# Altium PCB Kasli-DIOT.PCBDOC (part 5 of 23)
Units mm, origin at the board's own origin, x right, y up, seen from the top; angles counter-clockwise.
Board outline 222.9 x 100 mm, 10 copper layers (TopLayer, Layer 2, Layer 3, Layer 4, Layer 5, Layer 6, Layer 7, layer 8, Layer 9, BottomLayer), stack 1.564 mm thick; 977 components, 900 nets, 4676 pads, 2725 vias.
Unrouted connection lines stored in the file: 17.
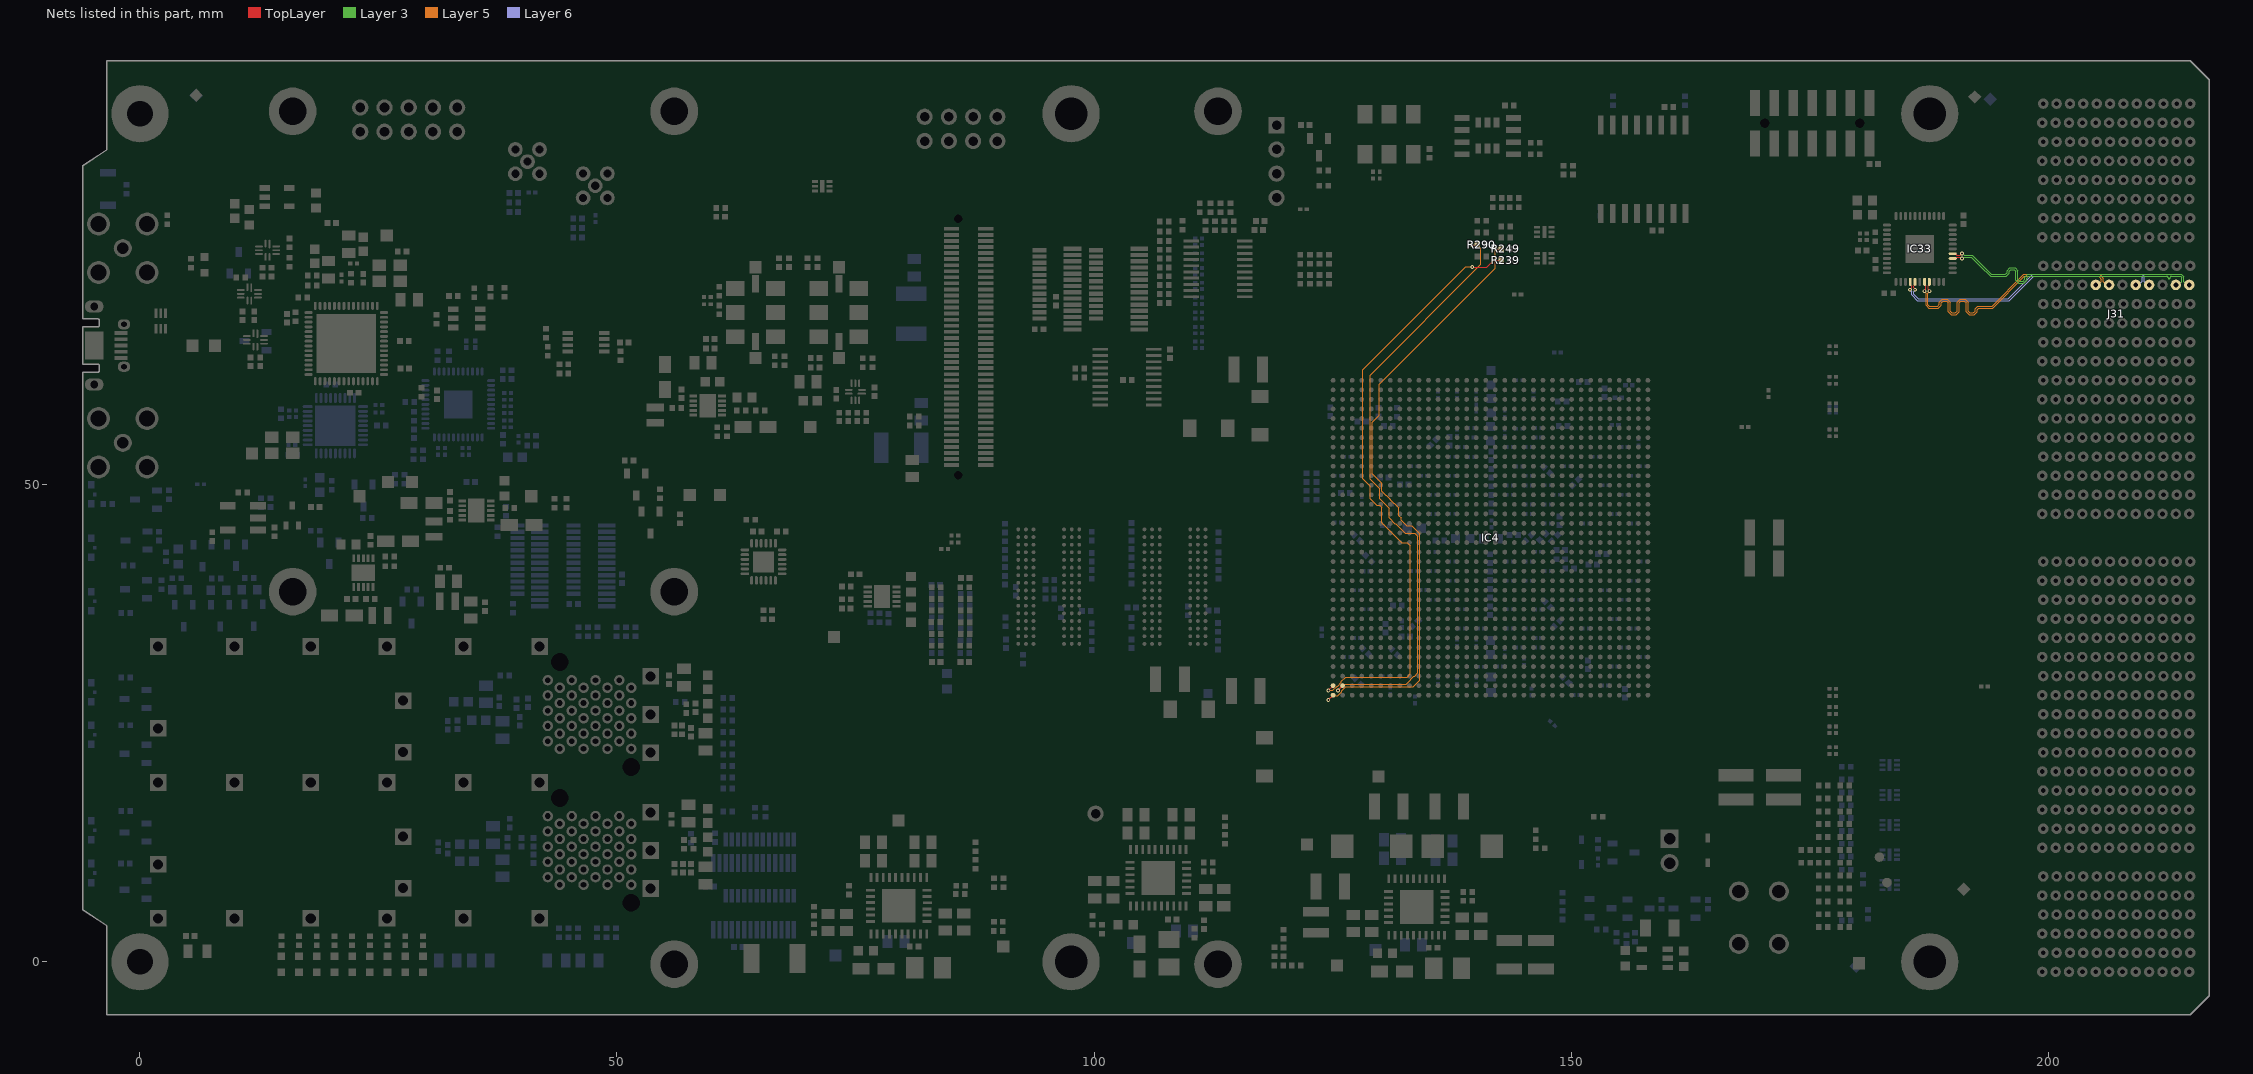
[diagram p12: the nets of this part, all layers, seen from the top]

## Part data (continued)
IC22: "Dual Bidirectional I2C Bus And SMBus Voltage-Level Translator", Case=SSOP8, Manufacturer="TEXAS INSTRUMENTS", Author="CERN DEM JLC", Bonding=No, ComponentHeight=1.3mm, Component Type=Standard, CreateDate=25.02.2013, Device=PCA9306DCTR, HelpURL=\\cern.ch\dfs\Applications\Altium\Datasheets\PCA9306DCTR.pdf, LatestRevisionDate=11.02.2016, Manufacturer Part Number=PCA9306DCTR, Mounted=Yes, PackageDescription="SOP, 0.65mm, Pitch; 8 Pin, 2.80mm W X 2.95mm L X 1.30mm H Body, PC Medium Density", Part Description="Dual Bidirectional I2C Bus And SMBus Voltage-Level Translator", Part Number=PCA9306DCTR, Pin Count=8, PressFit=No, Sense=No, SMD=Yes, Socket=No
IC24 IC25 IC34: "16-bit I/O Port Expander With Serial Interface", Case=SSOP28, Manufacturer="MICROCHIP TECHNOLOGY", Author="CERN DEM JLC", Bonding=No, ComponentHeight=2mm, Component Type=Standard, CreateDate=2011-01-17, Device=MCP23017-E/SS, HelpURL=\\cern.ch\dfs\Applications\Altium\Datasheets\MCP23017-E-SS.pdf, LatestRevisionDate=2011-01-17, Manufacturer Part Number=MCP23017-E/SS, Mounted=Yes, PackageDescription="SOP, 0.65mm Pitch; 28 pin, 5.30mm W X 10.20mm L X 2.00mm H body, IPC Medium Density", Part Description="16-bit I/O Port Expander With Serial Interface", Part Number=MCP23017-E/SS, Pin Count=28, PressFit=No, Sense=No, SMD=Yes, Socket=No
IC26: "500mA Peak Output LDO Regulator", Case=SOT23-5, Manufacturer="MICROCHIP TECHNOLOGY", Author="CERN DEM WB", Bonding=No, ComponentHeight=1.45mm, Component Type=Standard, CreateDate=2019-04-16, Device=MIC5219-3.3YM5, HelpURL=\\cern.ch\dfs\Applications\Altium\Datasheets\MIC5219-3.3YM5.pdf, LatestRevisionDate=2019-04-16, Manufacturer Part Number=MIC5219-3.3YM5, Mounted=Yes, PackageDescription="SOT, 0.95mm pitch; 5 pin, 1.60mm W X 2.90mm L X 1.45mm H body, IPC Medium Density", Part Description="3.3V 500mA Peak Output Low Drop-Out  (LDO) Regulator", Part Number=MIC5219-3.3YM5, Pin Count=5, PressFit=No, Sense=No, SMD=Yes, Socket=No
IC27 IC35: library part CMP-015-00010-1, "Octal Bus Transceiver With 3-State Outputs 20-TSSOP -40 to 125", Case/Package=TSSOP, Max Operating Temperature=125°C, Max Supply Voltage=3.6V, Min Operating Temperature=-40°C, Min Supply Voltage=1.65V, Mounting Technology="Surface Mount", Pins=20
IC28 IC29 IC38: "Low-Voltage 16-Bit I2C-Bus I/O Port with Interrupt and Reset", Case=TSSOP24, Manufacturer="NXP SEMICONDUCTORS", Author="CERN DEM JMW", Bonding=No, Component Type=Standard, ComponentHeight=1.1mm, CreateDate=2020-08-06, Device=PCA9539APW, HelpURL=\\cern.ch\dfs\Applications\Altium\Datasheets\PCA9539APW.pdf, LatestRevisionDate=2020-08-06, Manufacturer Part Number=PCA9539APW, Mounted=Yes, PackageDescription="SOP, 0.65mm Pitch; 24 Pin, 4.40mm W X 7.80mm L X 1.10mm H body, IPC Medium Density", Part Description="Low-Voltage 16-Bit I2C-Bus I/O Port with Interrupt and Reset", Part Number=PCA9539APW, Pin Count=24, PressFit=No, Sense=No, SMD=Yes, Socket=No
IC30: "1.7V-5.5V, 2K I2C Serial EEPROM With EUI-48 Node Identity", Case=SOT23-6, Manufacturer="MICROCHIP TECHNOLOGY", Author="CERN DEM BC", Bonding=No, Component Type=Standard, ComponentHeight=1.45mm, CreateDate=2019-12-06, Device=24AA025E48T-I/OT, HelpURL=\\cern.ch\dfs\Applications\Altium\Datasheets\24AA025E48T-I-OT.pdf, LatestRevisionDate=2019-12-06, Manufacturer Part Number=24AA025E48T-I/OT, Mounted=Yes, PackageDescription="SOT, 0.95mm pitch; 6 pin, 1.60mm W X 2.90mm L X 1.45mm H body, IPC Medium Density", Part Description="1.7V-5.5V, 2K I2C Serial EEPROM With EUI-48™ Node Identity; Cascadable", Part Number=24AA025E48T-I/OT, Pin Count=6, PressFit=No, Sense=No, SMD=Yes, Socket=No
IC31: "1.7V-5.5V, 2K I2C™ Serial EEPROMs with EUI-48™ Node Identity", Case=SOIC8, Manufacturer="MICROCHIP TECHNOLOGY", Author="CERN DEM MR", Bonding=No, Component Type=Standard, ComponentHeight=1.75mm, CreateDate=2016-07-19, Device=24AA025E48-I/SN, HelpURL=\\cern.ch\dfs\Applications\Altium\Datasheets\24AA025E48-I-SN.pdf, LatestRevisionDate=2016-07-19, Manufacturer Part Number=24AA025E48-I/SN, Mounted=Yes, PackageDescription="SOIC, 1.27mm Pitch; 8 Pin - Body 4x5mm, IPC Medium Density", Part Description="1.7V-5.5V, 2K I2C™ Serial EEPROMs with EUI-48™ Node Identity", Part Number=24AA025E48-I/SN, Pin Count=8, PressFit=No, Sense=No, SMD=Yes, Socket=No
IC32: library part CMP-0138-00394-1, "Micropower Voltage Supervisors, 3-Pin SOT-23, Extended Temperature, Tape and Reel", Code_IPC=SOT23-3, DatasheetVersion="revB, Mar-2005", PackageDescription="3-Lead Plastic Small Outline Transistor (TT) [SOT-23]", PackageReference=SOT-23-TT3, PackageVersion="revBB, Aug-2009"
IC37: "3.3V 300mA Voltage Regulator - CMOS Low Dropout", Case=SOT23-5, Manufacturer="ON SEMICONDUCTOR", Author="CERN DEM HF", Bonding=No, Component Type=Standard, ComponentHeight=1mm, CreateDate=20.10.2023, Device=NCP114ASN330T, HelpURL=\\cern.ch\dfs\Applications\Altium\Datasheets\NCP114ASN330T.pdf, LatestRevisionDate=20.10.2023, Manufacturer Part Number=NCP114ASN330T, Mounted=Yes, PackageDescription="SOT23, 0.95mm Pitch; 5 Pin, 1.60mm W X 2.90mm L X 1.00mm H body, IPC Medium Density", Part Description="3.3V 300mA Voltage Regulator - CMOS Low Dropout", Part Number=NCP114ASN330T, Pin Count=5, PressFit=No, Sense=No, SMD=Yes, Socket=No
J1 J2: library part SAMTEC_MMCX-J-P-H-ST-TH1, Manufacturer=SAMTEC, Author="CERN DEM JLC", ComponentHeight=4.35mm, Component Type=Standard, CreateDate=05.12.2012, HelpURL=\\cern.ch\dfs\Applications\Altium\Datasheets\SAMTEC_MMCX-J-P-H-ST-TH1.pdf, LatestRevisionDate=05.12.2012, Manufacturer Part Number=MMCX-J-P-H-ST-TH1, Mounted=Yes, Part Description="Straight Through-hole 50 Ohm Micro Mini RF Jack, MMCX Series", Part Number=SAMTEC_MMCX-J-P-H-ST-TH1, Pin Count=2, PressFit=No, Sense=No, SMD=No, Socket=No, Status=None
J3: library part MOLEX_39-28-1043, "Connector 4 Male", Manufacturer=MOLEX, Manufacturer Part Number=39-28-1043, Author="CERN DEM JLC", Component Type=Standard, ComponentHeight=13.1mm, CreateDate=12.03.2009, Family="Mini-Fit Jr.™", HelpURL=\\cern.ch\dfs\Applications\Altium\Datasheets\MOLEX_39-28-1043.pdf, LatestRevisionDate=06.03.2012, Mounted=Yes, Part Description="4.20mm (.165\") Pitch Mini-Fit Jr.™ Header, Dual Row, Vertical, without Snap-in Plastic Peg PCB Lock, 4 Circuits", Part Number=MOLEX_39-28-1043, Pin Count=4, PressFit=No, Sense=No, SMD=No, Socket=No, Status=None
J4: library part SAMTEC_TSM-102-01-L-DV, "Connector 4 Male", Manufacturer=SAMTEC, Manufacturer Part Number=TSM-102-01-L-DV, Author="CERN DEM MR", Component Type=Standard, ComponentHeight=9.65mm, CreateDate=28.11.2017, Family="Header 2", HelpURL=\\cern.ch\dfs\Applications\Altium\Datasheets\SAMTEC_TSM-102-01-L-DV.pdf, LatestRevisionDate=28.11.2017, Mounted=Yes, Part Description="2 Contacts, Pitch 2.54mm, Dual Row Surface Mount Straight Header (Post Lead 5.84mm)", Part Number=SAMTEC_TSM-102-01-L-DV, Pin Count=4, PressFit=No, Sense=No, SMD=Yes, Socket=No, Status=None
J5: library part SAMTEC_LSS-140-01-L-DV-A, "Connector 80 Hermaphroditic", Manufacturer=SAMTEC, Manufacturer Part Number=LSS-140-01-L-DV-A, Author="CERN DEM JMW", Component Type=Standard, ComponentHeight=4.57mm, CreateDate=10.11.2015, HelpURL=\\cern.ch\dfs\Applications\Altium\Datasheets\SAMTEC_LSS-140-01-L-DV-A.pdf, LatestRevisionDate=10.11.2015, Mounted=Yes, Part Description="80 Contacts, Pitch 0.635mm, Razor Beam LSS Vertical High Speed Hermaphroditic Strip (Lead Style 4.5mm)", Part Number=SAMTEC_LSS-140-01-L-DV-A, Pin Count=80, PressFit=No, Sense=No, SMD=Yes, Socket=No, Status=None
J6 J18: library part AMPHENOL_919-383J-51A, Manufacturer=AMPHENOL, Manufacturer Part Number=919-383J-51A, Author="CERN DEM BC", Component Type=Standard, ComponentHeight=6mm, CreateDate=31.01.2019, Family=MCX, HelpURL=\\cern.ch\dfs\Applications\Altium\Datasheets\AMPHENOL_919-383J-51A.pdf, LatestRevisionDate=31.01.2019, Mounted=Yes, Part Description="50 Ohms, RF Connector, MCX Right Angle PCB Receptacle Jack", Part Number=AMPHENOL_919-383J-51A, Pin Count=5, PressFit=No, Sense=No, SMD=No, Socket=No, Status=None
J8: library part MOLEX_87832-1420, "Connector 14 Male", Manufacturer=MOLEX, Manufacturer Part Number=87832-1420, Author="CERN DEM JLC", ComponentHeight=7.6mm, Component Type=Standard, CreateDate=09.09.2008, Family=Milli-Grid™, HelpURL=\\cern.ch\dfs\Applications\Altium\Datasheets\MOLEX_87832-1420.pdf, LatestRevisionDate=09.09.2008, Mounted=Yes, Part Description="2.00mm (.079\") Pitch Milli-Grid™ Header, Surface Mount, Vertical, Shrouded, 14 Circuits,with Locking Windows and Centre Polarization Slot, PCB Locator", Part Number=MOLEX_87832-1420, Pin Count=14, PressFit=No, Sense=No, SMD=Yes, Socket=No, Status=None
J11: library part AMPHENOL_10052838-101LF, "96 Contacts Header, 8 Columns, 4 Pairs per Column", Manufacturer=AMPHENOL, Manufacturer Part Number=10052838-101LF, Author="CERN DEM MR", ClassName=Overlapping, ComponentHeight=15.35mm, ComponentLink1Description=Application, ComponentLink1URL=\\cern.ch\dfs\Applications\Altium\Datasheets\AMPHENOL_10052838-101LF_Application.pdf, Component Type=Standard, CreateDate=19/02/2018, Family="AirMax VS", HelpURL=\\cern.ch\dfs\Applications\Altium\Datasheets\AMPHENOL_10052838-101LF.pdf, LatestRevisionDate=19/02/2018, Mounted=Yes, Part Description="96 Contacts, 2mm Pitch, 8 Columns, 4 Pairs per Column, 4 Walls, Right Angle Header", Part Number=AMPHENOL_10052838-101LF, Pin Count=96, PressFit=Yes, Sense=No, SMD=No, Socket=No, Status=None
J12 J29 J33: library part AMPHENOL_10052837-101LF, "96 Contacts Header, 8 Columns, 4 Pairs per Column", Manufacturer=AMPHENOL, Manufacturer Part Number=10052837-101LF, Author="CERN DEM MR", ComponentHeight=15.35mm, ComponentLink1Description=Application, ComponentLink1URL=\\cern.ch\dfs\Applications\Altium\Datasheets\AMPHENOL_10052837-101LF_Application.pdf, Component Type=Standard, CreateDate=19/02/2018, Family="AirMax VS", HelpURL=\\cern.ch\dfs\Applications\Altium\Datasheets\AMPHENOL_10052837-101LF.pdf, LatestRevisionDate=19/02/2018, Mounted=Yes, Part Description="96 Contacts, 2mm Pitch, 8 Columns, 4 Pairs per Column, 2 Walls, Right Angle Header", Part Number=AMPHENOL_10052837-101LF, Pin Count=96, PressFit=Yes, Sense=No, SMD=No, Socket=No, Status=None
J14: library part AMPHENOL_10052825-101LF, "72 Contacts Header, 6 Columns, 4 Pairs per Column", Manufacturer=AMPHENOL, Manufacturer Part Number=10052825-101LF, Author="CERN DEM MR", ClassName=Overlapping, ComponentHeight=15.35mm, ComponentLink1Description=Application, ComponentLink1URL=\\cern.ch\dfs\Applications\Altium\Datasheets\AMPHENOL_10052825-101LF_Application.pdf, Component Type=Standard, CreateDate=19/02/2018, Family="AirMax VS", HelpURL=\\cern.ch\dfs\Applications\Altium\Datasheets\AMPHENOL_10052825-101LF.pdf, LatestRevisionDate=19/02/2018, Mounted=Yes, Part Description="72 Contacts, 2mm Pitch, 6 Columns, 4 Pairs per Column, 4 Walls, Right Angle Header", Part Number=AMPHENOL_10052825-101LF, Pin Count=72, PressFit=Yes, Sense=No, SMD=No, Socket=No, Status=None
J19: library part AMPHENOL_UE78B212700321, "20 Position SFP  Connector (Small Form-factor Pluggable)", Manufacturer=AMPHENOL, Manufacturer Part Number=UE78B212700321, Author="CERN DEM BC", ComponentHeight=25.45mm, Component Type=Standard, CreateDate=25.10.2019, Family=SFP, HelpURL=\\cern.ch\dfs\Applications\Altium\Datasheets\AMPHENOL_UE78B212700321.pdf, LatestRevisionDate=25.10.2019, Mounted=Yes, Part Description="2x2 SFP Cage (Small Form-factor Pluggable) with 4x20 Positions Integrated Receptacles (Press Fit Tails)", Part Number=AMPHENOL_UE78B212700321, Pin Count=110, PressFit=Yes, Sense=No, SMD=No, Socket=No, Status=None
J21: library part MOLEX_22-27-2021, "Connector 2 Male", Manufacturer=MOLEX, Manufacturer Part Number=22-27-2021, Author="CERN DEM JLC", ComponentHeight=11.7mm, Component Type=Standard, CreateDate=04.12.2008, Family=KK®, HelpURL=\\cern.ch\dfs\Applications\Altium\Datasheets\MOLEX_22-27-2021.pdf, LatestRevisionDate=04.12.2008, Mounted=Yes, Part Description="2.54mm (.100\") Pitch KK® Wire-to-Board Header, Vertical, with Friction Lock, 2 Circuits, Tin (Sn) Plating", Part Number=MOLEX_22-27-2021, Pin Count=2, PressFit=No, Sense=No, SMD=No, Socket=No, Status=None
J23: library part HIROSE_ZX62RD-AB-5P8, "5 Pin + 1 Shield USB Receptacle", Manufacturer="HIROSE (HRS)", Manufacturer Part Number=ZX62RD-AB-5P8, Author="CERN DEM JLC", Component Type=Standard, ComponentHeight=2.35mm, ComponentLink1Description=Package-Drawing, ComponentLink1URL=\\cern.ch\dfs\Applications\Altium\Datasheets\HIROSE_ZX62RD-AB-5P8_Package-Drawing.pdf, CreateDate=29.10.2014, Family="Micro-USB AB 2.0", HelpURL=\\cern.ch\dfs\Applications\Altium\Datasheets\HIROSE_ZX62RD-AB-5P8.pdf, LatestRevisionDate=22.06.2017, Mounted=Yes, Part Description="Micro-USB 2.0 Right Angle, SMD Type AB - Reverse (Top mount), Shell Through Hole", Part Number=HIROSE_ZX62RD-AB-5P8, Pin Count=7, PressFit=No, Sense=No, SMD=Yes, Socket=No, Status=Obsolete
J24: library part SAMTEC_TSW-105-07-L-D-LL, "Connector 10 Male", Manufacturer=SAMTEC, Manufacturer Part Number=TSW-105-07-L-D-LL, Author="CERN DEM JLC", ComponentHeight=8.38mm, Component Type=Standard, CreateDate=2012-01-23, Family="Header 10", HelpURL=\\cern.ch\dfs\Applications\Altium\Datasheets\SAMTEC_TSW-105-07-L-D-LL.pdf, LatestRevisionDate=2012-07-26, Mounted=Yes, Part Description="10 Contacts, Pitch 2.54mm, Dual Row Through Mount  Straight Header With Locking Lead (Lead Length 2.54mm)", Part Number=SAMTEC_TSW-105-07-L-D-LL, Pin Count=10, PressFit=No, Sense=No, SMD=No, Socket=No, Status=None
J31: library part AMPHENOL_10052824-101LF, "72 Contacts Header, 6 Columns, 4 Pairs per Column", Manufacturer=AMPHENOL, Manufacturer Part Number=10052824-101LF, Author="CERN DEM JMW", ComponentHeight=15.35mm, ComponentLink1Description=Application, ComponentLink1URL=\\cern.ch\dfs\Applications\Altium\Datasheets\AMPHENOL_10052824-101LF_Application.pdf, Component Type=Standard, CreateDate=29/11/2017, Family="AirMax VS", HelpURL=\\cern.ch\dfs\Applications\Altium\Datasheets\AMPHENOL_10052824-101LF.pdf, LatestRevisionDate=29/11/2017, Mounted=Yes, Part Description="72 Contacts, 2mm Pitch, 6 Columns, 4 Pairs per Column, 2 Walls, Right Angle Header", Part Number=AMPHENOL_10052824-101LF, Pin Count=72, PressFit=Yes, Sense=No, SMD=No, Socket=No, Status=None
L1 L3 L23 L35: library part IND_2.2UH_20%_WURTH_WE-PMCI_74479276222C, "Inductor", Case=0806, Manufacturer="WURTH ELEKTRONIK", Manufacturer Part Number=74479276222C, Power=1.1A, Resistance=0.112R, Tolerance=±20%, Author="CERN DEM JLC", ComponentHeight=1mm, Component Type=Standard, CreateDate=20.10.2016, HelpURL=\\cern.ch\dfs\Applications\Altium\Datasheets\IND_WURTH_WE-PMCI_74479276222C.pdf, LatestRevisionDate=20.10.2016, Mounted=Yes, Part Description="SMD Power Molded Chip  Inductor (WE-PMCI Series)", Part Number=IND_2.2UH_20%_WURTH_WE-PMCI_74479276222C, Pin Count=2, Sense=No, SMD=Yes, Socket=No, Status=None
L2 L4 L5 L19 L20 L21 L22 L24 L25 L29 L30 L31 L32 L33 L34 L36 L37: library part IND0603_MURATA_BLM18SG121TN1D, "Inductor", Case=0603, Manufacturer=MURATA, Manufacturer Part Number=BLM18SG121TN1D, Power=3A, Resistance=0.025R, Tolerance=±25%, Author="CERN DEM JLC", ComponentHeight=0.65mm, Component Type=Standard, CreateDate=23.07.2014, HelpURL=\\cern.ch\dfs\Applications\Altium\Datasheets\IND0603_MURATA_BLM18S.pdf, LatestRevisionDate=23.07.2014, Mounted=Yes, Part Description="SMD EMIFIL Suppression Chip Ferrite Bead", Part Number=IND0603_MURATA_BLM18SG121TN1D, Pin Count=2, Sense=No, SMD=Yes, Socket=No, Status=None
  L4 L5: ClassName=Artix
L7: library part IND_1UH_30%_BOURNS_SRN3015, "Inductor", Manufacturer=BOURNS, Manufacturer Part Number=SRN3015-1R0Y, Power=2.35A, Resistance=0.048R, Tolerance=±30%, Author="CERN DEM JLC", Component Type=Standard, ComponentHeight=1.5mm, CreateDate=03.02.2015, HelpURL=\\cern.ch\dfs\Applications\Altium\Datasheets\IND_BOURNS_SRN3015.pdf, LatestRevisionDate=03.02.2015, Mounted=Yes, Part Description="Semi-Shielded SMD Power Inductor", Part Number=IND_1UH_30%_BOURNS_SRN3015, Pin Count=2, Sense=No, SMD=Yes, Socket=No
L9: library part IND0603_MURATA_BLM18PG121SN1D, "Inductor", Case=0603, Manufacturer=MURATA, Manufacturer Part Number=BLM18PG121SN1D, Power=2A, Resistance=0.05R, Author="CERN DEM BC", Component Type=Standard, ComponentHeight=0.95mm, CreateDate=2015-07-27, HelpURL=\\cern.ch\dfs\Applications\Altium\Datasheets\IND0603_MURATA_BLM18P.pdf, LatestRevisionDate=2015-07-27, Mounted=Yes, Part Description="SMD EMIFIL Chip Ferrite Bead", Part Number=IND0603_MURATA_BLM18PG121SN1D, Pin Count=2, Sense=No, SMD=Yes, Socket=No, Status=None
LD1 LD2 LD3 LD5 LD6 LD7 LD8 LD9 LD10 LD12: library part LED_KINGBRIGHT_KPH-1608CGCK, "LED Green 1C 2A", Manufacturer=KINGBRIGHT, Manufacturer Part Number=KPH-1608CGCK, Author="CERN DEM JLC", Bonding=No, Color=Green, ComponentHeight=0.65mm, Component Type=Standard, CreateDate=03.07.2017, HelpURL=\\cern.ch\dfs\Applications\Altium\Datasheets\LED_KINGBRIGHT_KPH-1608CGCK.pdf, LatestRevisionDate=03.07.2017, Mounted=Yes, PackageDescription="SMT Green LED, Case 0603, Body L 1.6 x W 0.8mm H 0.65mm", Part Description="SMD Green LED, Case 1.6mmX0.8mm(0603), 0.65mm Thickness", Part Number=LED_KINGBRIGHT_KPH-1608CGCK, Pin Count=2, PressFit=No, Sense=No, SMD=Yes, Socket=No
LD11 LD13 LD15 LD16 LD17 LD18: library part LED_AVAGO_HSME-C120, "LED Green 1C 2A", Manufacturer="AVAGO TECHNOLOGIES", Manufacturer Part Number=HSME-C120, Author="CERN DEM JMW", Bonding=No, Color=Green, ComponentHeight=0.7mm, ComponentLink1Description="Design Guide", ComponentLink1URL=\\cern.ch\dfs\Applications\Altium\Datasheets\LED_AVAGO_HSME-C110_DESIGN-GUIDE.pdf, Component Type=Standard, CreateDate=22.07.2009, HelpURL=\\cern.ch\dfs\Applications\Altium\Datasheets\LED_AVAGO_HSME-C120.pdf, LatestRevisionDate=20.06.2012, Mounted=Yes, PackageDescription="Green Chip LED, 2-Leads, Body 1.7x1.1mm, Side Emitting Package", Part Description="High Performance Right Angle Chip Green LED", Part Number=LED_AVAGO_HSME-C120, Pin Count=2, PressFit=No, Sense=No, SMD=Yes, Socket=No
LD14: library part LED_AVAGO_HSMC-C120, "LED Red 1C 2A", Manufacturer="AVAGO TECHNOLOGIES", Manufacturer Part Number=HSMC-C120, Author="CERN DEM JMW", Bonding=No, Color=Red, Component Type=Standard, ComponentHeight=0.7mm, ComponentLink1Description="Design Guide", ComponentLink1URL=\\cern.ch\dfs\Applications\Altium\Datasheets\LED_AVAGO_HSMC-C120_DESIGN-GUIDE.pdf, CreateDate=2009-07-22, HelpURL=\\cern.ch\dfs\Applications\Altium\Datasheets\LED_AVAGO_HSMC-C120.pdf, LatestRevisionDate=2012-06-20, Mounted=Yes, PackageDescription="Red Chip LED, 2-Leads, Body 1.7x1.1mm, Side Emitting Package", Part Description="High Performance Right Angle Chip Red LED", Part Number=LED_AVAGO_HSMC-C120, Pin Count=2, PressFit=No, Sense=No, SMD=Yes, Socket=No
M1 M2: library part PLATED_HOLE2.7_PAD6.0, "Single Terminal Socket", Author="CERN DEM HF", Component Type="Standard (No BOM)", ComponentHeight=0mm, CreateDate=28.08.2024, Family="Plated Hole", HelpURL=Undefined, LatestRevisionDate=28.08.2024, Mounted=No, PackageDescription="Plated Through Hole: Hole Dia.=2.7mm Pad Dia.=6.0mm", Part Description="Plated Through Hole: Hole Dia.=2.7mm Pad Dia.=6.0mm", Part Number=PLATED_HOLE2.7_PAD6.0, Pin Count=1, Sense=No, SMD=No, Socket=No, Status=None
M3 M4 M5 M6: library part CMP-00028-00019-2, "PTH  Hole 3.4, 6mm pad", Pins=1
OSC1 OSC3: library part OSC_0.2-800MHZ_SILICON-LAB_549BACB001937ABG, "Ultra Low Jitter I2C Programmable Crystal Oscillator (XO), Si549 Series", Manufacturer="SILICON LABS", Manufacturer Part Number=549BACB001937ABG, Author="CERN DEM JMW", Bonding=No, Component Type=Standard, ComponentHeight=1.33mm, CreateDate=27.11.2019, HelpURL=\\cern.ch\dfs\Applications\Altium\Datasheets\OSC_SILICON-LAB_SI549.pdf, LatestRevisionDate=02.12.2019, Mounted=Yes, PackageDescription="Oscillator Si549 Series, 8 pins, 5x7mm", Part Description="0.2-800MHz, 1.8V/2.5V/3.3V ±20ppm LVDS, Ultra Low Jitter I2C Programmable Crystal Oscillator (XO), Si549 Series", Part Number=OSC_0.2-800MHZ_SILICON-LAB_549BACB001937ABG, Pin Count=8, PressFit=No, Sense=No, SMD=Yes, Socket=No
OSC2: library part OSC_125MHZ_SILICON-LAB_510FBA125M000AAG, "Crystal Oscillator 6 pins, Si510 (LVDS/LVPECL/HCSL/Dual CMOS)", Manufacturer="SILICON LABS", Manufacturer Part Number=510FBA125M000AAG, Author="CERN DEM JMW", Bonding=No, ComponentHeight=1.8mm, Component Type=Standard, CreateDate=2015-08-10, HelpURL=\\cern.ch\dfs\Applications\Altium\Datasheets\OSC_SILICON-LAB_SI510.pdf, LatestRevisionDate=2015-08-10, Mounted=Yes, PackageDescription="Oscillator Si510 Series, 6 pins, 5x7mm", Part Description="2.5V ±25ppm LVDS Crystal Oscillator (XO), Si510 Series", Part Number=OSC_125MHZ_SILICON-LAB_510FBA125M000AAG, Pin Count=6, PressFit=No, Sense=No, SMD=Yes, Socket=No
Plate1 Plate2 Plate3 Plate4: library part AMPHENOL_U77A11108000P, "Plastic Dust Cover SFP Cage", Manufacturer=AMPHENOL, Manufacturer Part Number=U77A11108000P, Author="CERN DEM BC", ComponentHeight=10.2mm, Component Type=Standard, CreateDate=28.10.2019, HelpURL=\\cern.ch\dfs\Applications\Altium\Datasheets\AMPHENOL_U77A11108000P.pdf, LatestRevisionDate=28.10.2019, Mounted=Yes, PackageDescription="Plastic Dust Cover SFP Cage", Part Description="Plastic Dust Cover SFP Cage", Part Number=AMPHENOL_U77A11108000P, Pin Count=0, PressFit=No, Sense=No, SMD=No, Socket=No, Status=None
Q1: library part XTAL_114.285MHZ_CONNOR_CS-023, "Crystal 4 pins 1=XTAL Control 2=GND3=XTAL 4=GND", Manufacturer=CONNOR-WINFIELD, Manufacturer Part Number=CS-023-114.285M, Author="CERN DEM JLC", Bonding=No, ComponentHeight=0.8mm, Component Type=Standard, CreateDate=2014-07-08, HelpURL=\\cern.ch\dfs\Applications\Altium\Datasheets\XTAL_CONNOR_CS-023.pdf, LatestRevisionDate=2014-07-08, Mounted=Yes, PackageDescription="4 Pins, 2.5x3.2mm, SMD Sealing Crystal, CS Series", Part Description="±20ppm 18pF -40°C to +85°C  4 Pins, 3.2x2.5X0.8mm, SMD Crystal Unit, CS-018 Series", Part Number=XTAL_114.285MHZ_CONNOR_CS-023, Pin Count=4, PressFit=No, Sense=No, SMD=Yes, Socket=No
Q2: library part XTAL_12MHZ_TXC_7M-12.000MAAJ-T, "Crystal 4 pins 1=XTAL Control 2=GND3=XTAL 4=GND", Manufacturer="TXC CORPORATION", Manufacturer Part Number=7M-12.000MAAJ-T, Author="CERN DEM JLC", Bonding=No, ComponentHeight=0.8mm, Component Type=Standard, CreateDate=19.06.2012, HelpURL=\\cern.ch\dfs\Applications\Altium\Datasheets\XTAL_TXC_7M.pdf, LatestRevisionDate=19.06.2012, Mounted=Yes, PackageDescription="4 Pins, 2.5x3.2mm, SMD Sealing Crystal, 7M Serie", Part Description="±30ppm 18pF -20°C to +70°C  4 Pins, 3.2x2.5X0.8mm, SMD Sealing Crystal, 7M Series", Part Number=XTAL_12MHZ_TXC_7M-12.000MAAJ-T, Pin Count=4, PressFit=No, Sense=No, SMD=Yes, Socket=No
R1 R2 R4 R5 R16 R18 R31 R33 R40 R46 R58 R60 R63 R66 R75 R76 R77 R78 R79 R81 R85 R92 R127 R128 R129 R130 R133 R134 R135 R136 R137 R138 R139 R140 R141 R144 R145 R151 R152 R153 R154 R155 R158 R159 R174 R176 R177 R183 R184 R185 R186 R187 R188 R189 R190 R193 R194 R195 R196 R197 R198 R201 R202 R203 R204 R206 R207 R209 R210 R211 R213 R215 R217 R218 R219 R222 R223 R225 R240 R242 R243 R244 R245 R246 R247 R252 R256 R260 R261 R264 R265 R306 R307 R308 R310: library part R0402_10K_1%_0.0625W_100PPM, "Resistor - 1%", Case=0402, Manufacturer=GENERIC, Manufacturer1 ComponentHeight=0.4mm, Manufacturer1 Example="YAGEO PHYCOMP", Manufacturer1 Part Number=232270671003L, Power=0.0625W, Tolerance=±1%, Author="CERN DEM JLC", Component Type=Standard, HelpURL=\\cern.ch\dfs\Applications\Altium\Datasheets\R0402_Phycomp_RC0402.pdf, Manufacturer Part Number=R0402_10K_1%_0.0625W_100PPM, Mounted=Yes, Part Description="General Purpose Thick Film Chip Resistor", Part Number=R0402_10K_1%_0.0625W_100PPM, Pin Count=2, PressFit=No, Sense=No, SMD=Yes, Socket=No, Status="Not Recommended", TC=±100ppm/°C
  R1 R2 R4 R5 R16 R18 R31 R33 R40 R46 R60 R63 R66 R75 R76 R77 R78 R79 R81 R85 R92 R127 R128 R129 R130 R133 R134 R135 R136 R137 R138 R139 R140 R141 R144 R145 R151 R152 R153 R154 R155 R158 R159 R174 R176 R177 R183 R184 R185 R186 R187 R188 R189 R190 R193 R194 R195 R196 R197 R198 R201 R202 R203 R204 R206 R207 R209 R210 R211 R213 R215 R217 R218 R219 R222 R223 R225 R240 R242 R243 R244 R245 R246 R247 R252 R256 R264 R265 R306 R307 R308 R310: CreateDate=03.12.2007, LatestRevisionDate=17.10.2012
  R58: ClassName=FPGA_JTAG, CreateDate=03.12.2007, LatestRevisionDate=17.10.2012
  R260 R261: CreateDate=03/12/2007, LatestRevisionDate=17/10/2012
R3 R6 R12 R273: library part R0402_100R_1%_0.0625W_100PPM, "Resistor - 1%", Case=0402, Manufacturer=GENERIC, Manufacturer1 ComponentHeight=0.4mm, Manufacturer1 Example="YAGEO PHYCOMP", Manufacturer1 Part Number=232270671001L, Power=0.0625W, Tolerance=±1%, Author="CERN DEM JLC", Component Type=Standard, CreateDate=03.12.2007, HelpURL=\\cern.ch\dfs\Applications\Altium\Datasheets\R0402_Phycomp_RC0402.pdf, LatestRevisionDate=17.10.2012, Manufacturer Part Number=R0402_100R_1%_0.0625W_100PPM, Mounted=Yes, Part Description="General Purpose Thick Film Chip Resistor", Part Number=R0402_100R_1%_0.0625W_100PPM, Pin Count=2, PressFit=No, Sense=No, SMD=Yes, Socket=No, Status="Not Recommended", TC=±100ppm/°C
R7 R8: library part R0402_49R9_1%_0.0625W_100PPM, "Resistor - 1%", Case=0402, Manufacturer=GENERIC, Manufacturer1 ComponentHeight=0.4mm, Manufacturer1 Example="YAGEO PHYCOMP", Manufacturer1 Part Number="232270674999L or RC0402FR-0749R9L", Power=0.0625W, Tolerance=±1%, Author="CERN DEM JLC", Component Type=Standard, CreateDate=24.10.2012, HelpURL=\\cern.ch\dfs\Applications\Altium\Datasheets\R0402_Phycomp_RC0402.pdf, LatestRevisionDate=24.10.2012, Manufacturer Part Number=R0402_49R9_1%_0.0625W_100PPM, Mounted=Yes, Part Description="General Purpose Thick Film Chip Resistor", Part Number=R0402_49R9_1%_0.0625W_100PPM, Pin Count=2, PressFit=No, Sense=No, SMD=Yes, Socket=No, Status="Not Recommended", TC=±100ppm/°C
R9: library part R0402_68R_1%_0.0625W_100PPM, "Resistor - 1%", Case=0402, Manufacturer=GENERIC, Manufacturer1 ComponentHeight=0.4mm, Manufacturer1 Example="YAGEO PHYCOMP", Manufacturer1 Part Number=232270676809L, Power=0.0625W, Tolerance=±1%, Author="CERN DEM JLC", Component Type=Standard, CreateDate=03.12.2007, HelpURL=\\cern.ch\dfs\Applications\Altium\Datasheets\R0402_Phycomp_RC0402.pdf, LatestRevisionDate=17.10.2012, Manufacturer Part Number=R0402_68R_1%_0.0625W_100PPM, Mounted=Yes, Part Description="General Purpose Thick Film Chip Resistor", Part Number=R0402_68R_1%_0.0625W_100PPM, Pin Count=2, PressFit=No, Sense=No, SMD=Yes, Socket=No, Status="Not Recommended", TC=±100ppm/°C
R10 R49: library part R0402_24K_1%_0.0625W_100PPM, "Resistor - 1%", Case=0402, Manufacturer=GENERIC, Manufacturer1 ComponentHeight=0.4mm, Manufacturer1 Example="YAGEO PHYCOMP", Manufacturer1 Part Number=232270672403L, Power=0.0625W, Tolerance=±1%, Author="CERN DEM JLC", Component Type=Standard, CreateDate=03.12.2007, HelpURL=\\cern.ch\dfs\Applications\Altium\Datasheets\R0402_Phycomp_RC0402.pdf, LatestRevisionDate=17.10.2012, Manufacturer Part Number=R0402_24K_1%_0.0625W_100PPM, Mounted=Yes, Part Description="General Purpose Thick Film Chip Resistor", Part Number=R0402_24K_1%_0.0625W_100PPM, Pin Count=2, PressFit=No, Sense=No, SMD=Yes, Socket=No, Status="Not Recommended", TC=±100ppm/°C
R11 R20 R99 R100 R142 R143 R216 R220 R226: library part R0402_240R_1%_0.0625W_100PPM, "Resistor - 1%", Case=0402, Manufacturer=GENERIC, Manufacturer1 ComponentHeight=0.4mm, Manufacturer1 Example="YAGEO PHYCOMP", Manufacturer1 Part Number=232270672401L, Power=0.0625W, Tolerance=±1%, Author="CERN DEM JLC", Component Type=Standard, HelpURL=\\cern.ch\dfs\Applications\Altium\Datasheets\R0402_Phycomp_RC0402.pdf, Manufacturer Part Number=R0402_240R_1%_0.0625W_100PPM, Mounted=Yes, Part Description="General Purpose Thick Film Chip Resistor", Part Number=R0402_240R_1%_0.0625W_100PPM, Pin Count=2, PressFit=No, Sense=No, SMD=Yes, Socket=No, Status="Not Recommended", TC=±100ppm/°C
  R11 R20 R142 R143 R216 R220 R226: CreateDate=03.12.2007, LatestRevisionDate=17.10.2012
  R99 R100: CreateDate=12/3/2007, LatestRevisionDate=10/17/2012
R13 R21 R27 R29 R30 R36 R38 R48 R51 R53 R54 R56 R65 R67 R80 R82 R97 R98 R131 R132 R146 R175 R214 R236 R237 R238 R239 R249 R253 R257 R274 R275 R290 R291 R292 R301: library part R0402_0R_JUMPER, "Resistor", Case=0402, Manufacturer=GENERIC, Manufacturer1 ComponentHeight=0.4mm, Manufacturer1 Example="YAGEO PHYCOMP", Manufacturer1 Part Number=232270591001L, Author="CERN DEM JLC", Component Type=Standard, HelpURL=\\cern.ch\dfs\Applications\Altium\Datasheets\R0402_Phycomp_RC0402.pdf, Manufacturer Part Number=R0402_0R_JUMPER, Mounted=Yes, Part Description="1A (0.05R Max DC Resistance) Zero Ohm Jumper", Part Number=R0402_0R_JUMPER, Pin Count=2, PressFit=No, Sense=No, SMD=Yes, Socket=No, Status="Not Recommended"
  R13 R21 R27 R29 R30 R36 R38 R48 R51 R54 R56 R65 R67 R80 R82 R97 R98 R146 R175 R214 R236 R237 R238 R239 R249 R253 R257 R274 R275 R290 R291 R292 R301: CreateDate=03.12.2007, LatestRevisionDate=17.10.2012
  R53: ClassName=Artix, CreateDate=03.12.2007, LatestRevisionDate=17.10.2012
  R131 R132: CreateDate=2007-12-03, LatestRevisionDate=2012-10-17
R14: library part R0402_20K_1%_0.0625W_100PPM, "Resistor - 1%", Case=0402, Manufacturer=GENERIC, Manufacturer1 ComponentHeight=0.4mm, Manufacturer1 Example="YAGEO PHYCOMP", Manufacturer1 Part Number=232270672003L, Power=0.0625W, Tolerance=±1%, Author="CERN DEM JLC", Component Type=Standard, CreateDate=03.12.2007, HelpURL=\\cern.ch\dfs\Applications\Altium\Datasheets\R0402_Phycomp_RC0402.pdf, LatestRevisionDate=17.10.2012, Manufacturer Part Number=R0402_20K_1%_0.0625W_100PPM, Mounted=Yes, Part Description="General Purpose Thick Film Chip Resistor", Part Number=R0402_20K_1%_0.0625W_100PPM, Pin Count=2, PressFit=No, Sense=No, SMD=Yes, Socket=No, Status="Not Recommended", TC=±100ppm/°C
R15 R44 R55 R87: library part R0402_1k_1%_0.0625W_100PPM, "Resistor - 1%", Case=0402, Manufacturer=GENERIC, Manufacturer1 ComponentHeight=0.4mm, Manufacturer1 Example="YAGEO PHYCOMP", Manufacturer1 Part Number=232270671002L, Manufacturer Part Number=R0402_1K_1%_0.0625W_100PPM, Power=0.0625W, Tolerance=±1%, Author="CERN DEM JLC", Component Type=Standard, CreateDate=03.12.2007, HelpURL=\\cern.ch\dfs\Applications\Altium\Datasheets\R0402_Phycomp_RC0402.pdf, LatestRevisionDate=17.10.2012, Mounted=Yes, Part Description="General Purpose Thick Film Chip Resistor", Part Number=R0402_1K_1%_0.0625W_100PPM, Pin Count=2, PressFit=No, Sense=No, SMD=Yes, Socket=No, Status="Not Recommended", TC=±100ppm/°C
  R44 R55: ClassName=Artix
R17 R73 R83 R84 R125 R293 R294 R295 R296 R300: library part R0402_4K7_1%_0.0625W_100PPM, "Resistor - 1%", Case=0402, Manufacturer=GENERIC, Manufacturer1 ComponentHeight=0.4mm, Manufacturer1 Example="YAGEO PHYCOMP", Manufacturer1 Part Number=232270674702L, Power=0.0625W, Tolerance=±1%, Author="CERN DEM JLC", Component Type=Standard, HelpURL=\\cern.ch\dfs\Applications\Altium\Datasheets\R0402_Phycomp_RC0402.pdf, Manufacturer Part Number=R0402_4K7_1%_0.0625W_100PPM, Mounted=Yes, Part Description="General Purpose Thick Film Chip Resistor", Part Number=R0402_4K7_1%_0.0625W_100PPM, Pin Count=2, PressFit=No, Sense=No, SMD=Yes, Socket=No, Status="Not Recommended", TC=±100ppm/°C
  R17 R125 R293 R294 R295 R296: CreateDate=03.12.2007, LatestRevisionDate=17.10.2012
  R73 R83 R84 R300: CreateDate=03-Dec-07, LatestRevisionDate=17-Oct-12
R19 R23 R34 R35 R41 R45 R50 R94 R95 R96 R148 R149 R200 R205 R208 R227: library part R0402_2K2_1%_0.0625W_100PPM, "Resistor - 1%", Case=0402, Manufacturer=GENERIC, Manufacturer1 ComponentHeight=0.4mm, Manufacturer1 Example="YAGEO PHYCOMP", Manufacturer1 Part Number=232270672202L, Power=0.0625W, Tolerance=±1%, Author="CERN DEM JLC", Component Type=Standard, CreateDate=03.12.2007, HelpURL=\\cern.ch\dfs\Applications\Altium\Datasheets\R0402_Phycomp_RC0402.pdf, LatestRevisionDate=17.10.2012, Manufacturer Part Number=R0402_2K2_1%_0.0625W_100PPM, Mounted=Yes, Part Description="General Purpose Thick Film Chip Resistor", Part Number=R0402_2K2_1%_0.0625W_100PPM, Pin Count=2, PressFit=No, Sense=No, SMD=Yes, Socket=No, Status="Not Recommended", TC=±100ppm/°C
  R19 R23 R45 R94 R95 R96 R227: ClassName=Artix
R22 R304 R305: library part R0402_200R_1%_0.0625W_100PPM, "Resistor - 1%", Case=0402, Manufacturer=GENERIC, Manufacturer1 ComponentHeight=0.4mm, Manufacturer1 Example="YAGEO PHYCOMP", Manufacturer1 Part Number=232270672001L, Power=0.0625W, Tolerance=±1%, Author="CERN DEM JLC", Component Type=Standard, CreateDate=03.12.2007, HelpURL=\\cern.ch\dfs\Applications\Altium\Datasheets\R0402_Phycomp_RC0402.pdf, LatestRevisionDate=17.10.2012, Manufacturer Part Number=R0402_200R_1%_0.0625W_100PPM, Mounted=Yes, Part Description="General Purpose Thick Film Chip Resistor", Part Number=R0402_200R_1%_0.0625W_100PPM, Pin Count=2, PressFit=No, Sense=No, SMD=Yes, Socket=No, Status="Not Recommended", TC=±100ppm/°C
R24 R26 R32 R39 R59 R64: library part R0402_15K_1%_0.0625W_100PPM, "Resistor - 1%", Case=0402, Manufacturer=GENERIC, Manufacturer1 ComponentHeight=0.4mm, Manufacturer1 Example=VISHAY, Manufacturer1 Part Number=CRCW040215K0FK, Power=0.0625W, Tolerance=±1%, Author="CERN DEM JMW", Component Type=Standard, CreateDate=06.07.2015, HelpURL="\\cern.ch\dfs\Applications\Altium\Datasheets\R0402_VISHAY_CRCW e3.pdf", LatestRevisionDate=06.07.2015, Manufacturer Part Number=R0402_15K_1%_0.0625W_100PPM, Mounted=Yes, Part Description="General Purpose Thick Film Chip Resistor", Part Number=R0402_15K_1%_0.0625W_100PPM, Pin Count=2, PressFit=No, Sense=No, SMD=Yes, Socket=No, Status=Preferred, TC=±100ppm/°C
R25 R255: library part R0402_33K_1%_0.0625W_100PPM, "Resistor - 1%", Case=0402, Manufacturer=GENERIC, Manufacturer1 ComponentHeight=0.4mm, Manufacturer1 Example="YAGEO PHYCOMP", Manufacturer1 Part Number=232270673303L, Power=0.0625W, Tolerance=±1%, Author="CERN DEM JLC", Component Type=Standard, CreateDate=12/3/2007, HelpURL=\\cern.ch\dfs\Applications\Altium\Datasheets\R0402_Phycomp_RC0402.pdf, LatestRevisionDate=10/17/2012, Manufacturer Part Number=R0402_33K_1%_0.0625W_100PPM, Mounted=Yes, Part Description="General Purpose Thick Film Chip Resistor", Part Number=R0402_33K_1%_0.0625W_100PPM, Pin Count=2, PressFit=No, Sense=No, SMD=Yes, Socket=No, Status="Not Recommended", TC=±100ppm/°C
R28 R42 R43 R52 R61 R147 R221 R224 R228 R229 R230 R231 R232 R233 R234 R235 R258 R259: library part R0402_1K_1%_0.0625W_100PPM, "Resistor - 1%", Case=0402, Manufacturer=GENERIC, Manufacturer1 ComponentHeight=0.4mm, Manufacturer1 Example="YAGEO PHYCOMP", Manufacturer1 Part Number=232270671002L, Power=0.0625W, Tolerance=±1%, Author="CERN DEM JLC", Component Type=Standard, HelpURL=\\cern.ch\dfs\Applications\Altium\Datasheets\R0402_Phycomp_RC0402.pdf, Manufacturer Part Number=R0402_1K_1%_0.0625W_100PPM, Mounted=Yes, Part Description="General Purpose Thick Film Chip Resistor", Part Number=R0402_1K_1%_0.0625W_100PPM, Pin Count=2, PressFit=No, Sense=No, SMD=Yes, Socket=No, Status="Not Recommended", TC=±100ppm/°C
  R28: CreateDate=03.12.2007, LatestRevisionDate=17.10.2012
  R42 R43 R52 R61 R147 R221 R224 R228 R229 R230 R231 R232 R233 R234 R235: ClassName=Artix, CreateDate=03.12.2007, LatestRevisionDate=17.10.2012
  R258 R259: CreateDate=03/12/2007, LatestRevisionDate=17/10/2012
R37 R47: library part R0402_7K5_1%_0.0625W_100PPM, "Resistor - 1%", Case=0402, Manufacturer=GENERIC, Manufacturer1 ComponentHeight=0.4mm, Manufacturer1 Example="YAGEO PHYCOMP", Manufacturer1 Part Number=232270677502L, Power=0.0625W, Tolerance=±1%, Author="CERN DEM JLC", Component Type=Standard, CreateDate=03.12.2007, HelpURL=\\cern.ch\dfs\Applications\Altium\Datasheets\R0402_Phycomp_RC0402.pdf, LatestRevisionDate=17.10.2012, Manufacturer Part Number=R0402_7K5_1%_0.0625W_100PPM, Mounted=Yes, Part Description="General Purpose Thick Film Chip Resistor", Part Number=R0402_7K5_1%_0.0625W_100PPM, Pin Count=2, PressFit=No, Sense=No, SMD=Yes, Socket=No, Status="Not Recommended", TC=±100ppm/°C
R57: library part R0402_300R_1%_0.0625W_100PPM, "Resistor - 1%", Case=0402, Manufacturer=GENERIC, Manufacturer1 ComponentHeight=0.4mm, Manufacturer1 Example="YAGEO PHYCOMP", Manufacturer1 Part Number=232270673001L, Power=0.0625W, Tolerance=±1%, Author="CERN DEM JLC", Component Type=Standard, CreateDate=03.12.2007, HelpURL=\\cern.ch\dfs\Applications\Altium\Datasheets\R0402_Phycomp_RC0402.pdf, LatestRevisionDate=17.10.2012, Manufacturer Part Number=R0402_300R_1%_0.0625W_100PPM, Mounted=Yes, Part Description="General Purpose Thick Film Chip Resistor", Part Number=R0402_300R_1%_0.0625W_100PPM, Pin Count=2, PressFit=No, Sense=No, SMD=Yes, Socket=No, Status="Not Recommended", TC=±100ppm/°C
R62: library part R0402_68K_1%_0.0625W_100PPM, "Resistor - 1%", Case=0402, Manufacturer=GENERIC, Manufacturer1 ComponentHeight=0.4mm, Manufacturer1 Example="YAGEO PHYCOMP", Manufacturer1 Part Number=232270676803L, Power=0.0625W, Tolerance=±1%, Author="CERN DEM JLC", Component Type=Standard, CreateDate=03.12.2007, HelpURL=\\cern.ch\dfs\Applications\Altium\Datasheets\R0402_Phycomp_RC0402.pdf, LatestRevisionDate=17.10.2012, Manufacturer Part Number=R0402_68K_1%_0.0625W_100PPM, Mounted=Yes, Part Description="General Purpose Thick Film Chip Resistor", Part Number=R0402_68K_1%_0.0625W_100PPM, Pin Count=2, PressFit=No, Sense=No, SMD=Yes, Socket=No, Status="Not Recommended", TC=±100ppm/°C
R68: library part R0805_1M1_1%_0.125W_100PPM, "Resistor - 1%", Case=0805, Manufacturer=GENERIC, Manufacturer1 ComponentHeight=0.6mm, Manufacturer1 Example="NIC COMPONENT", Manufacturer1 Part Number=NRC10F1104TRF, Power=0.125W, Tolerance=±1%, Author="CERN DEM JLC", Component Type=Standard, CreateDate=03/12/2007, HelpURL=\\cern.ch\dfs\Applications\Altium\Datasheets\R0805_NIC_NRC.pdf, LatestRevisionDate=13/03/2008, Manufacturer Part Number=R0805_1M1_1%_0.125W_100PPM, Mounted=Yes, Part Description="General Purpose Thick Film Chip Resistor", Part Number=R0805_1M1_1%_0.125W_100PPM, Pin Count=2, PressFit=No, Sense=No, SMD=Yes, Socket=No, Status=Preferred, TC=±100ppm/°C
R69 R70 R71 R72: library part "R0805_4M7_1%_0.125W_100PPM_VISHAY_CRCW e3", "Resistor - 1%", Case=0805, Manufacturer=VISHAY, Manufacturer Part Number=CRCW08054M70FKEA, Power=0.125W, Tolerance=±1%, Author="CERN DEM BR", Component Type=Standard, ComponentHeight=0.5mm, CreateDate=27/05/2019, HelpURL="\\cern.ch\dfs\Applications\Altium\Datasheets\R0805_VISHAY_CRCW e3.pdf", LatestRevisionDate=27/05/2019, Mounted=Yes, Part Description="150V, Standard Thick Film Chip Resistor", Part Number="R0805_4M7_1%_0.125W_100PPM_VISHAY_CRCW e3", Pin Count=2, PressFit=No, Sense=No, SMD=Yes, Socket=No, Status=None, TC=±100ppm/°C
R74 R86 R88 R89 R90 R91 R150 R162 R163 R164 R165 R166 R167 R168 R169 R170 R171 R172 R173 R289: library part R0402_10k_1%_0.0625W_100PPM, "Resistor - 1%", Case=0402, Manufacturer=GENERIC, Manufacturer1 ComponentHeight=0.4mm, Manufacturer1 Example="YAGEO PHYCOMP", Manufacturer1 Part Number=232270671003L, Manufacturer Part Number=R0402_10K_1%_0.0625W_100PPM, Power=0.0625W, Tolerance=±1%, Author="CERN DEM JLC", Component Type=Standard, CreateDate=03.12.2007, HelpURL=\\cern.ch\dfs\Applications\Altium\Datasheets\R0402_Phycomp_RC0402.pdf, LatestRevisionDate=17.10.2012, Part Description="General Purpose Thick Film Chip Resistor", Part Number=R0402_10K_1%_0.0625W_100PPM, Pin Count=2, PressFit=No, Sense=No, SMD=Yes, Socket=No, Status="Not Recommended", TC=±100ppm/°C
  R74 R86 R88 R89 R90 R91 R150 R165 R166 R167 R168 R172 R173 R289: Mounted=Yes
  R162 R163 R164 R169 R170 R171: Mounted=No
R93: library part R0402_210K_1%_0.063W_100PPM, "Resistor - 1%", Case=0402, Manufacturer=GENERIC, Manufacturer1 ComponentHeight=0.4mm, Manufacturer1 Example=VISHAY, Manufacturer1 Part Number=CRCW0402210KFK, Power=0.063W, Tolerance=±1%, Author="CERN DEM BC", Component Type=Standard, CreateDate=08/02/2021, HelpURL="\\cern.ch\dfs\Applications\Altium\Datasheets\R0402_VISHAY_CRCW e3.pdf", LatestRevisionDate=08/02/2021, Manufacturer Part Number=R0402_210K_1%_0.063W_100PPM, Mounted=Yes, Part Description="General Purpose Thick Film Chip Resistor", Part Number=R0402_210K_1%_0.063W_100PPM, Pin Count=2, PressFit=No, Sense=No, SMD=Yes, Socket=No, Status=None, TC=±100ppm/°C
R101 R102 R103 R104 R105 R106 R107 R108 R109 R110 R111 R112 R113 R114 R115 R116 R117 R118 R119 R120 R121 R122 R123 R124 R126 R298: library part R0402_39R_1%_0.0625W_100PPM, "Resistor - 1%", Case=0402, Manufacturer=GENERIC, Manufacturer1 ComponentHeight=0.4mm, Manufacturer1 Example="YAGEO PHYCOMP", Manufacturer1 Part Number=232270673909L, Power=0.0625W, Tolerance=±1%, Author="CERN DEM JLC", Component Type=Standard, CreateDate=03.12.2007, HelpURL=\\cern.ch\dfs\Applications\Altium\Datasheets\R0402_Phycomp_RC0402.pdf, LatestRevisionDate=17.10.2012, Manufacturer Part Number=R0402_39R_1%_0.0625W_100PPM, Mounted=Yes, Part Description="General Purpose Thick Film Chip Resistor", Part Number=R0402_39R_1%_0.0625W_100PPM, Pin Count=2, PressFit=No, Sense=No, SMD=Yes, Socket=No, Status="Not Recommended", TC=±100ppm/°C
R156: library part R0402_11K_1%_0.0625W_100PPM, "Resistor - 1%", Case=0402, Manufacturer=GENERIC, Manufacturer1 ComponentHeight=0.4mm, Manufacturer1 Example="YAGEO PHYCOMP", Manufacturer1 Part Number=232270671103L, Power=0.0625W, Tolerance=±1%, Author="CERN DEM JLC", Component Type=Standard, CreateDate=03.12.2007, HelpURL=\\cern.ch\dfs\Applications\Altium\Datasheets\R0402_Phycomp_RC0402.pdf, LatestRevisionDate=17.10.2012, Manufacturer Part Number=R0402_11K_1%_0.0625W_100PPM, Mounted=Yes, Part Description="General Purpose Thick Film Chip Resistor", Part Number=R0402_11K_1%_0.0625W_100PPM, Pin Count=2, PressFit=No, Sense=No, SMD=Yes, Socket=No, Status="Not Recommended", TC=±100ppm/°C
R157: library part R0402_1K5_1%_0.0625W_100PPM, "Resistor - 1%", Case=0402, Manufacturer=GENERIC, Manufacturer1 ComponentHeight=0.4mm, Manufacturer1 Example="YAGEO PHYCOMP", Manufacturer1 Part Number=232270671502L, Power=0.0625W, Tolerance=±1%, Author="CERN DEM JLC", Component Type=Standard, CreateDate=03.12.2007, HelpURL=\\cern.ch\dfs\Applications\Altium\Datasheets\R0402_Phycomp_RC0402.pdf, LatestRevisionDate=17.10.2012, Manufacturer Part Number=R0402_1K5_1%_0.0625W_100PPM, Mounted=Yes, Part Description="General Purpose Thick Film Chip Resistor", Part Number=R0402_1K5_1%_0.0625W_100PPM, Pin Count=2, PressFit=No, Sense=No, SMD=Yes, Socket=No, Status="Not Recommended", TC=±100ppm/°C
R160 R161: library part R0201_100R_1%_0.05W_200PPM, "Resistor - 1%", Case=0201, Manufacturer=GENERIC, Manufacturer1 ComponentHeight=0.27mm, Manufacturer1 Example=VISHAY, Manufacturer1 Part Number=CRCW0201100RFNED, Power=0.05W, Tolerance=±1%, Author="CERN DEM JLC", Component Type=Standard, CreateDate=13.11.2014, HelpURL="\\cern.ch\dfs\Applications\Altium\Datasheets\R0201_VISHAY_CRCW e3.pdf", LatestRevisionDate=13.11.2014, Manufacturer Part Number=R0201_100R_1%_0.05W_200PPM, Mounted=Yes, Part Description="Thick Film Chip Resistor", Part Number=R0201_100R_1%_0.05W_200PPM, Pin Count=2, PressFit=No, Sense=No, SMD=Yes, Socket=No, Status="Not Recommended", TC=±200ppm/°C
R178 R179 R180 R181 R182 R191 R192 R212 R297: library part R0402_47K_1%_0.0625W_100PPM, "Resistor - 1%", Case=0402, Manufacturer=GENERIC, Manufacturer1 ComponentHeight=0.4mm, Manufacturer1 Example="YAGEO PHYCOMP", Manufacturer1 Part Number=232270674703L, Power=0.0625W, Tolerance=±1%, Author="CERN DEM JLC", Component Type=Standard, CreateDate=03.12.2007, HelpURL=\\cern.ch\dfs\Applications\Altium\Datasheets\R0402_Phycomp_RC0402.pdf, LatestRevisionDate=17.10.2012, Manufacturer Part Number=R0402_47K_1%_0.0625W_100PPM, Mounted=Yes, Part Description="General Purpose Thick Film Chip Resistor", Part Number=R0402_47K_1%_0.0625W_100PPM, Pin Count=2, PressFit=No, Sense=No, SMD=Yes, Socket=No, Status="Not Recommended", TC=±100ppm/°C
R199: library part R0402_12K_1%_0.0625W_100PPM, "Resistor - 1%", Case=0402, Manufacturer=GENERIC, Manufacturer1 ComponentHeight=0.4mm, Manufacturer1 Example="YAGEO PHYCOMP", Manufacturer1 Part Number=232270671203L, Power=0.0625W, Tolerance=±1%, Author="CERN DEM JLC", Component Type=Standard, CreateDate=03.12.2007, HelpURL=\\cern.ch\dfs\Applications\Altium\Datasheets\R0402_Phycomp_RC0402.pdf, LatestRevisionDate=17.10.2012, Manufacturer Part Number=R0402_12K_1%_0.0625W_100PPM, Mounted=Yes, Part Description="General Purpose Thick Film Chip Resistor", Part Number=R0402_12K_1%_0.0625W_100PPM, Pin Count=2, PressFit=No, Sense=No, SMD=Yes, Socket=No, Status="Not Recommended", TC=±100ppm/°C
R241: library part R0402_200K_1%_0.0625W_100PPM, "Resistor - 1%", Case=0402, Manufacturer=GENERIC, Manufacturer1 ComponentHeight=0.4mm, Manufacturer1 Example="YAGEO PHYCOMP", Manufacturer1 Part Number=232270672004L, Power=0.0625W, Tolerance=±1%, Author="CERN DEM JLC", Component Type=Standard, CreateDate=03.12.2007, HelpURL=\\cern.ch\dfs\Applications\Altium\Datasheets\R0402_Phycomp_RC0402.pdf, LatestRevisionDate=17.10.2012, Manufacturer Part Number=R0402_200K_1%_0.0625W_100PPM, Mounted=Yes, Part Description="General Purpose Thick Film Chip Resistor", Part Number=R0402_200K_1%_0.0625W_100PPM, Pin Count=2, PressFit=No, Sense=No, SMD=Yes, Socket=No, Status="Not Recommended", TC=±100ppm/°C
R248: library part R0402_430K_1%_0.0625W_100PPM, "Resistor - 1%", Case=0402, Manufacturer=GENERIC, Manufacturer1 ComponentHeight=0.4mm, Manufacturer1 Example="YAGEO PHYCOMP", Manufacturer1 Part Number=232270674304L, Power=0.0625W, Tolerance=±1%, Author="CERN DEM JLC", Component Type=Standard, CreateDate=03.12.2007, HelpURL=\\cern.ch\dfs\Applications\Altium\Datasheets\R0402_Phycomp_RC0402.pdf, LatestRevisionDate=17.10.2012, Manufacturer Part Number=R0402_430K_1%_0.0625W_100PPM, Mounted=Yes, Part Description="General Purpose Thick Film Chip Resistor", Part Number=R0402_430K_1%_0.0625W_100PPM, Pin Count=2, PressFit=No, Sense=No, SMD=Yes, Socket=No, Status="Not Recommended", TC=±100ppm/°C
R250 R251 R254: library part R0402_82K_1%_0.0625W_100PPM, "Resistor - 1%", Case=0402, Manufacturer=GENERIC, Manufacturer1 ComponentHeight=0.4mm, Manufacturer1 Example="YAGEO PHYCOMP", Manufacturer1 Part Number=232270678203L, Power=0.0625W, Tolerance=±1%, Author="CERN DEM JLC", Component Type=Standard, CreateDate=03.12.2007, HelpURL=\\cern.ch\dfs\Applications\Altium\Datasheets\R0402_Phycomp_RC0402.pdf, LatestRevisionDate=17.10.2012, Manufacturer Part Number=R0402_82K_1%_0.0625W_100PPM, Mounted=Yes, Part Description="General Purpose Thick Film Chip Resistor", Part Number=R0402_82K_1%_0.0625W_100PPM, Pin Count=2, PressFit=No, Sense=No, SMD=Yes, Socket=No, Status="Not Recommended", TC=±100ppm/°C
R262 R263 R266 R267 R268 R269 R270 R271 R272 R276 R277 R278 R279 R280 R281 R282 R283 R284 R285 R286 R287 R288: library part R0402_22R_1%_0.0625W_100PPM, "Resistor - 1%", Case=0402, Manufacturer=GENERIC, Manufacturer1 ComponentHeight=0.4mm, Manufacturer1 Example="YAGEO PHYCOMP", Manufacturer1 Part Number=232270672209L, Power=0.0625W, Tolerance=±1%, Author="CERN DEM JLC", Component Type=Standard, CreateDate=03.12.2007, HelpURL=\\cern.ch\dfs\Applications\Altium\Datasheets\R0402_Phycomp_RC0402.pdf, LatestRevisionDate=17.10.2012, Manufacturer Part Number=R0402_22R_1%_0.0625W_100PPM, Mounted=Yes, Part Description="General Purpose Thick Film Chip Resistor", Part Number=R0402_22R_1%_0.0625W_100PPM, Pin Count=2, PressFit=No, Sense=No, SMD=Yes, Socket=No, Status="Not Recommended", TC=±100ppm/°C
R299 R302 R303 R309: library part R0603_3k3_1%_0.1W_100PPM, "Resistor - 1%", Case=0603, Manufacturer=GENERIC, Manufacturer1 ComponentHeight=0.55mm, Manufacturer1 Example="NIC COMPONENT", Manufacturer1 Part Number=NRC06F3301TRF, Manufacturer Part Number=R0603_3K3_1%_0.1W_100PPM, Power=0.1W, Tolerance=±1%, Author="CERN DEM JLC", Component Type=Standard, CreateDate=03.12.2007, HelpURL=\\cern.ch\dfs\Applications\Altium\Datasheets\R0603_NIC_NRC.pdf, LatestRevisionDate=13.03.2008, Mounted=Yes, Part Description="General Purpose Thick Film Chip Resistor", Part Number=R0603_3K3_1%_0.1W_100PPM, Pin Count=2, PressFit=No, Sense=No, SMD=Yes, Socket=No, Status=Preferred, TC=±100ppm/°C
SW1: library part SW_OMRON_B3U-3000PM, "1 Ways SPST DIP Switch", Manufacturer=OMRON, Manufacturer Part Number=B3U-3000PM, Author="CERN DEM HF", Component Type=Standard, ComponentHeight=1.35mm, CreateDate=04.10.2022, Family=Switch, HelpURL=\\cern.ch\dfs\Applications\Altium\Datasheets\SW_OMRON_B3U.pdf, LatestRevisionDate=04.10.2022, Mounted=Yes, PackageDescription="Body 3.2x4.0mm, SPST Surface-Mounting Tactile Switch with Side Actuator (B3U Series)", Part Description="Ultra-small Surface-mounting Tactile Switche with High Contact Reliability, Side-actuated, Contact Rating 50mA 12VDC", Part Number=SW_OMRON_B3U-3000PM, Pin Count=2, PressFit=No, Sense=Yes, Sense Comment=Non-washable, SMD=Yes, Socket=No, Status=None
T1 T2 T3 T4 T5 T7 T11 T12 T13 T14 T16 T17 T18 T19 T20 T21 T22 T23 T24: "N-CHANNEL MOSFET WITH DIODE", Case=SOT23-3, Manufacturer="ON SEMICONDUCTOR", Manufacturer Part Number=BSS138L, Author="CERN DEM JLC", Bonding=No, Component Type=Standard, ComponentHeight=1.11mm, CreateDate=23.03.2009, Device=BSS138LT1G, HelpURL=\\cern.ch\dfs\Applications\Altium\Datasheets\BSS138LT1G.pdf, LatestRevisionDate=25.05.2022, Mounted=Yes, PackageDescription="SOT23, 0.95mm Pitch; 3 Pin, 1.40mm W X 3.00mm L X 1.10mm H body, IPC Medium Density", Part Description="50V, 200mA N-Channel Enhancement Mode Field-Effect Transistor", Part Number=BSS138LT1G, Pin Count=3, PressFit=No, Sense=No, SMD=Yes, Socket=No